# Altium PCB PCB2.PcbDoc
Units mil, origin at the board's own origin, x right, y up, seen from the top; angles counter-clockwise.
Board outline 2952.76 x 2952.76 mil, 2 copper layers (Top Layer, Bottom Layer); 41 components, 22 nets, 105 pads, 4 vias.
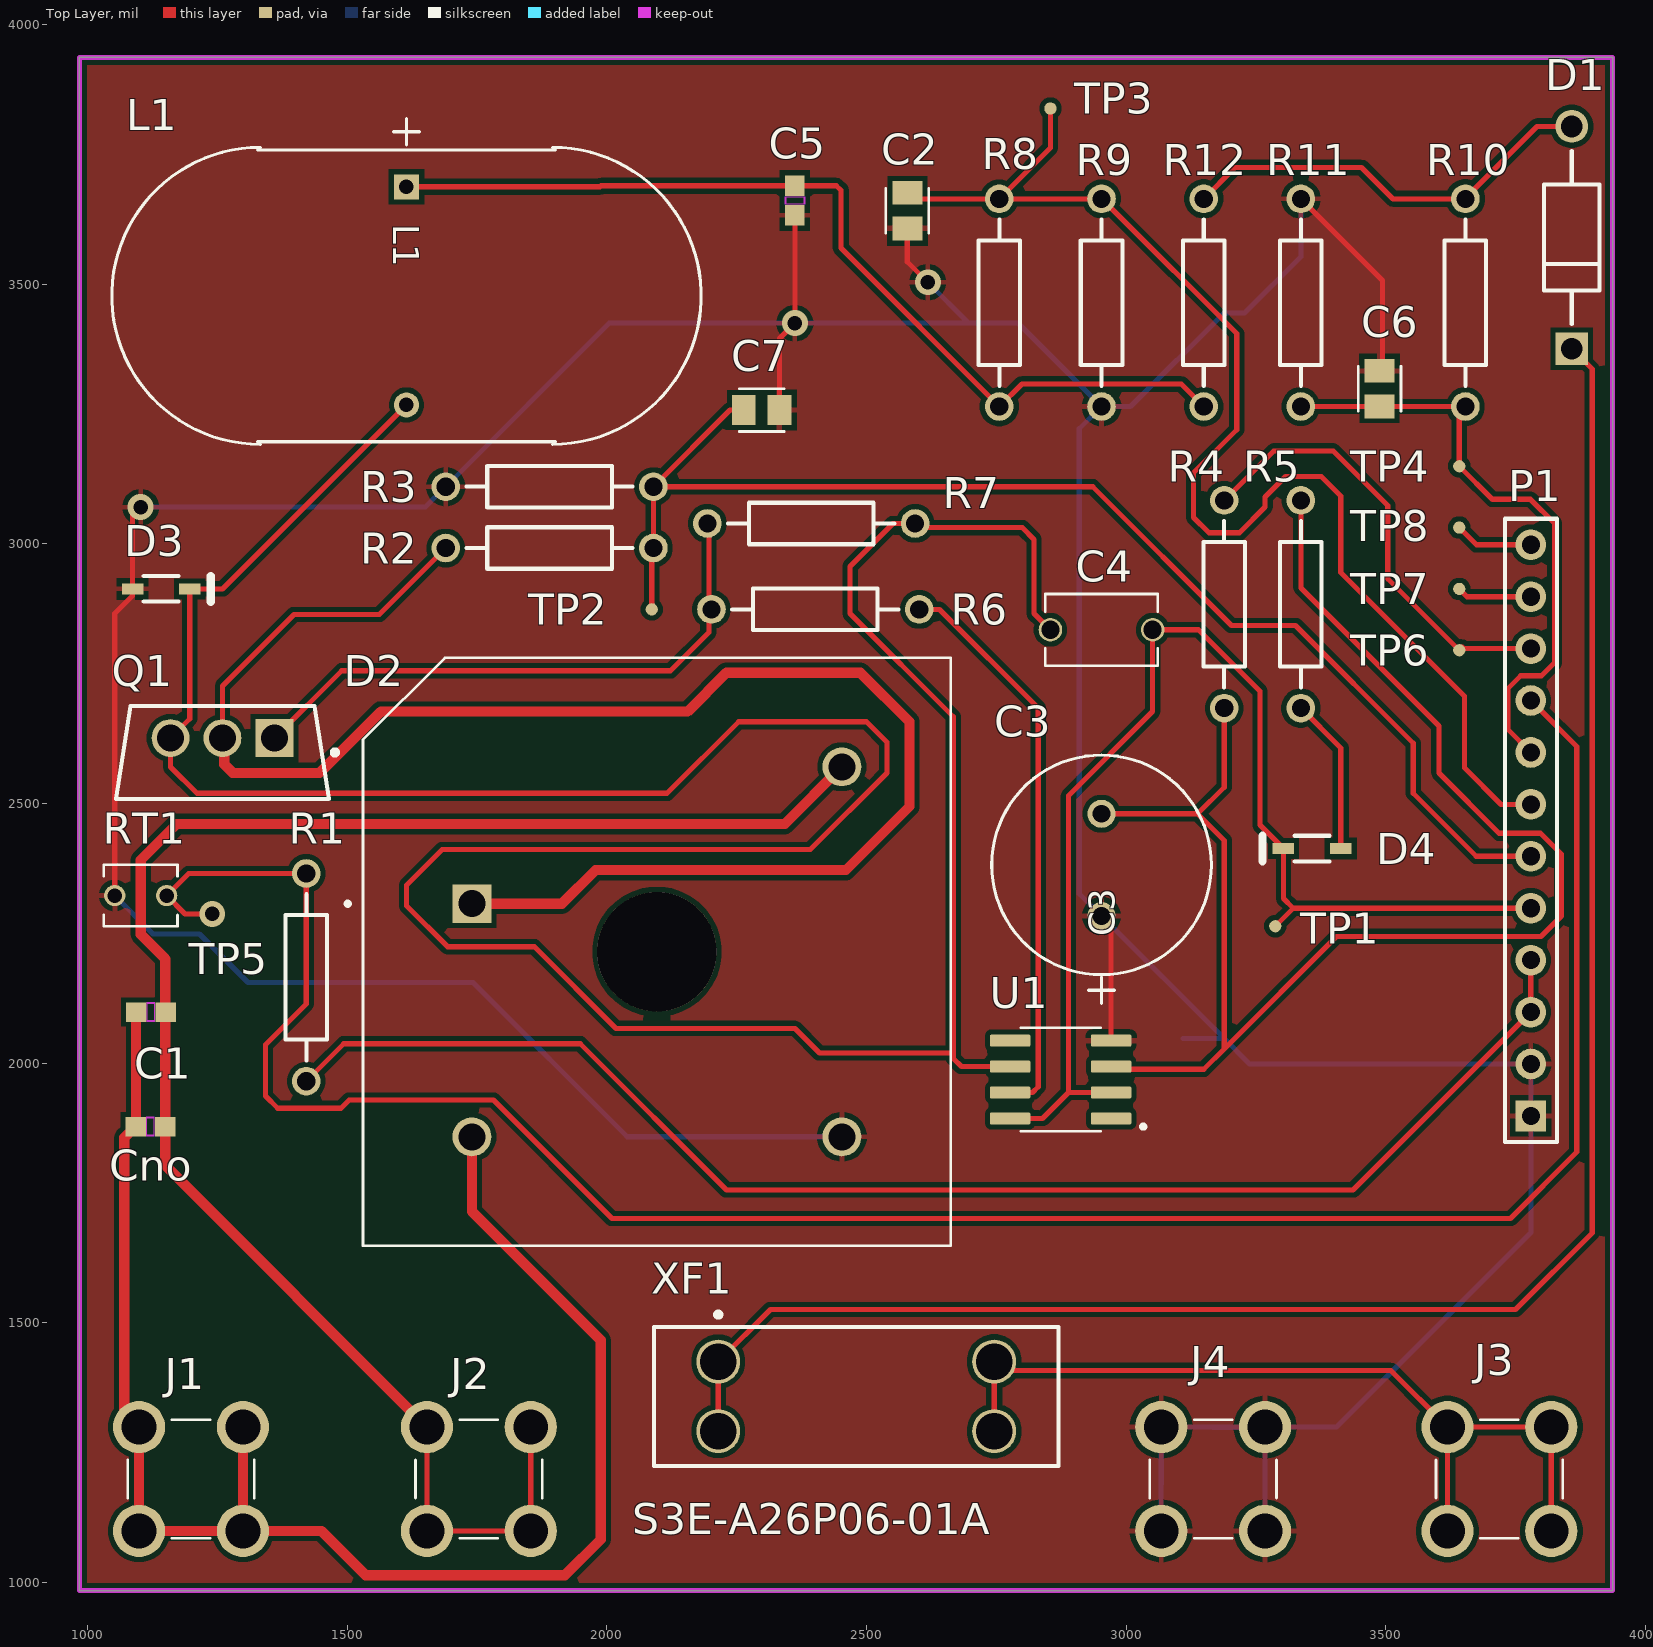
[diagram p0: Top Layer view]
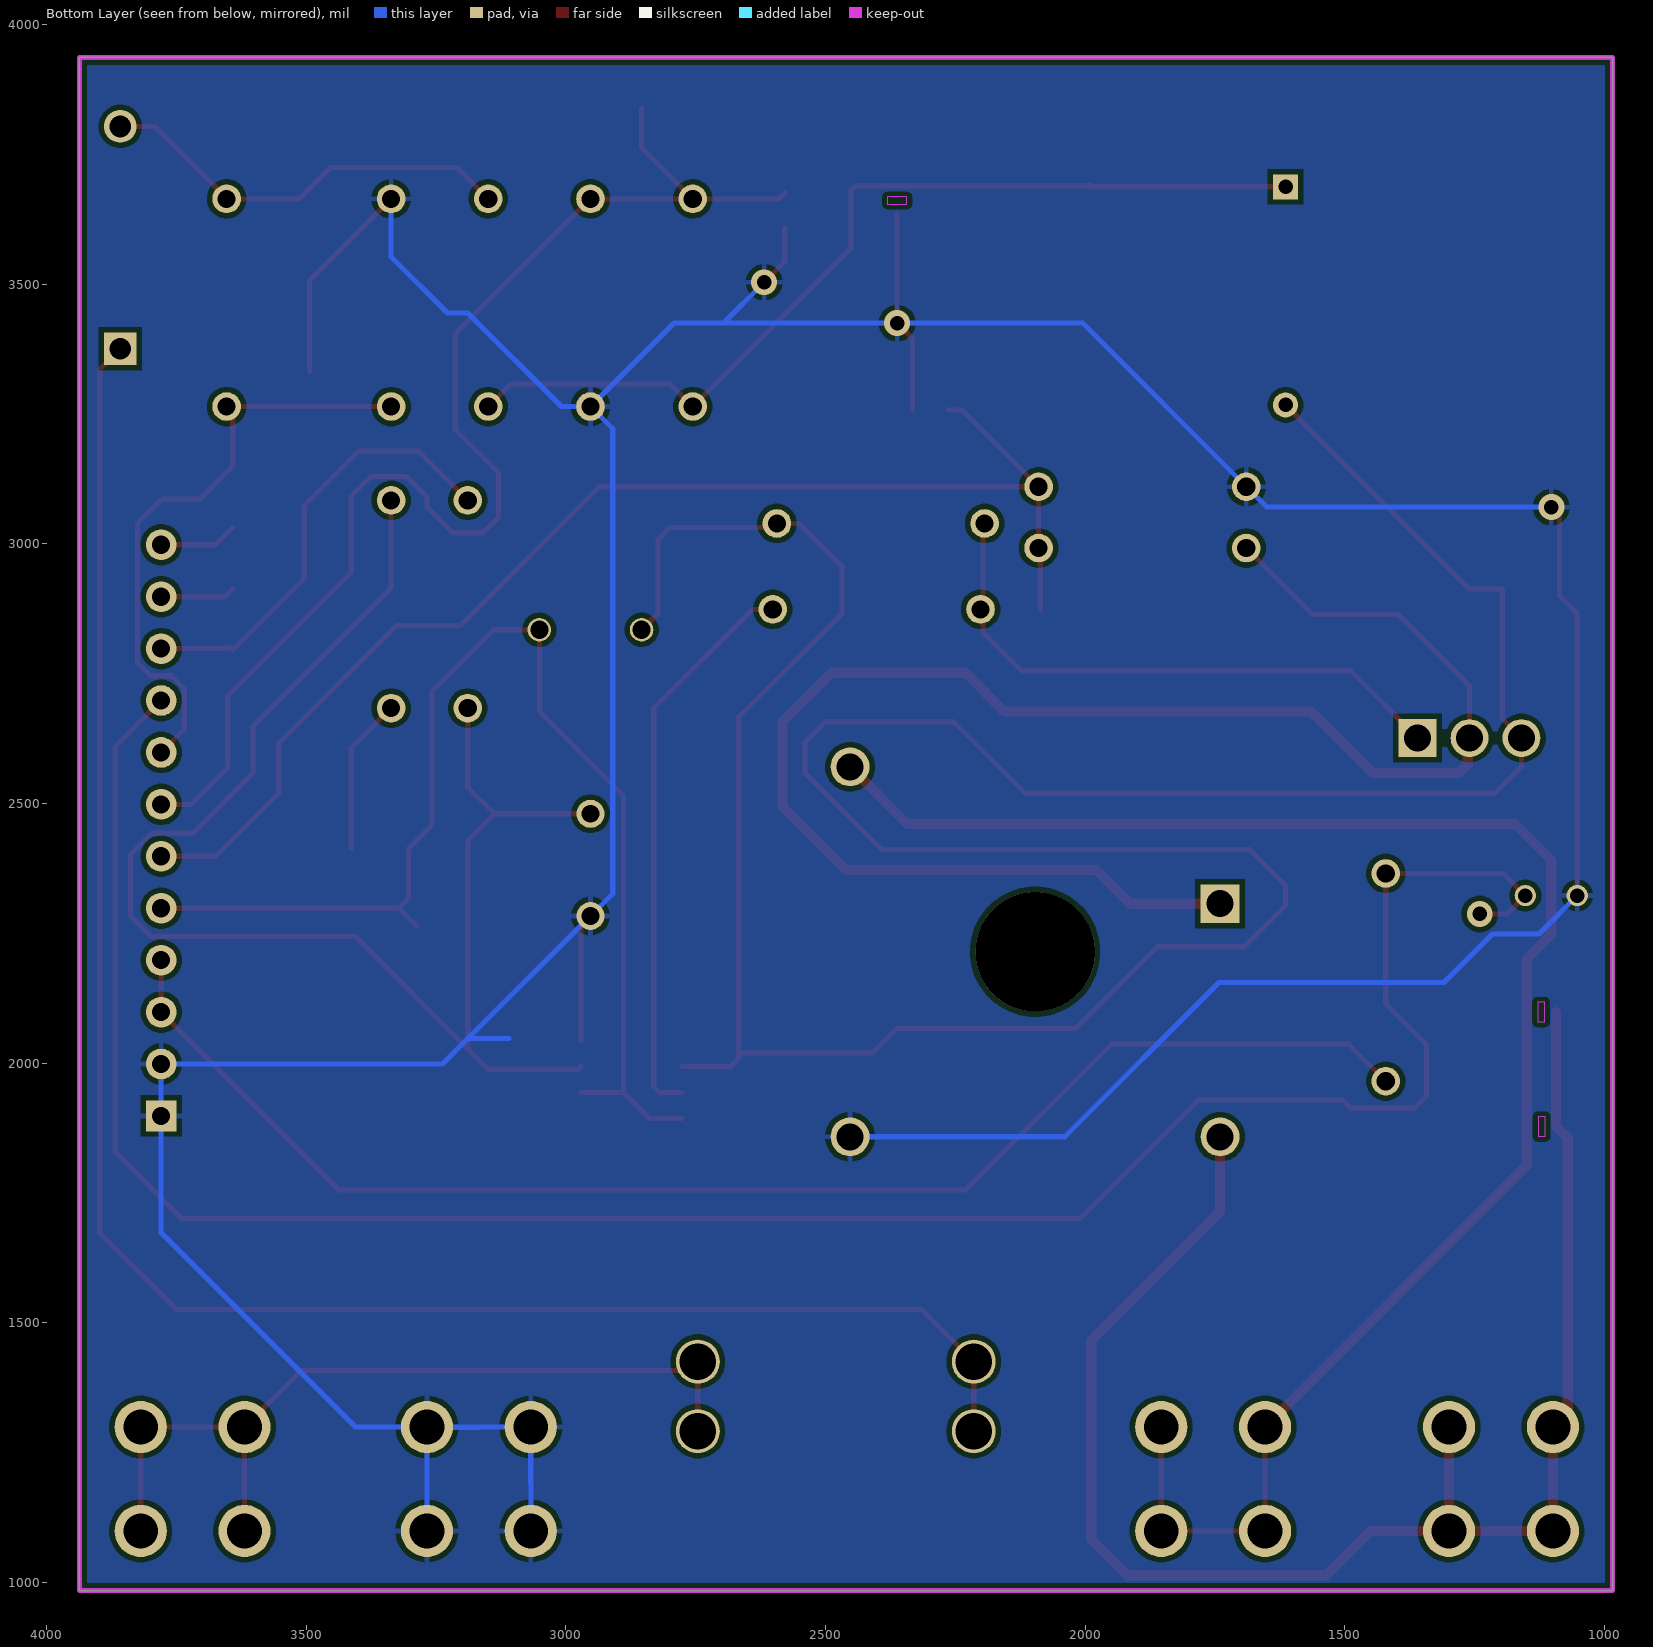
[diagram p1: Bottom Layer view, seen from below]

## Layer stack, top to bottom
Top Solder: solder mask 0.4, Solder Resist, Dk 3.5
Top Layer: signal copper 1.4
Dielectric 1: dielectric 12.6, FR-4, Dk 4.8
Bottom Layer: signal copper 1.4
Bottom Solder: solder mask 0.4, Solder Resist, Dk 3.5

## Board outline
984.25,984.25 984.25,3937.01 3937.01,3937.01 3937.01,984.25

## Design rules (kind name [scope] priority, off if disabled: settings)
Clearance [All] p1: gap=10 ignorepadtopadclearanceinfootprint=FALSE
PolygonConnect [All] p1: connectstyle=Relief reliefconductorwidth=10 reliefentries=4 polygonreliefangle="90 Angle" airgapwidth=10
RoutingVias [All] p1: holewidth=28 width=50 viastyle="Through Hole" minholewidth=28 minwidth=50 maxholewidth=28 maxwidth=50
SolderMaskExpansion [All] p1: expansion=0 istentingtop=FALSE
SupplyNets "Schematic Supply Nets_1" [InNet('+5')] p1: voltage=0.000
SupplyNets "Schematic Supply Nets" [InNet('GND')] p2: voltage=0.000
Width [All] p1: maxlimit=20 minlimit=10 preferedwidth=10 bottomlayer_maxwidth=10 minimp=50.000000 maximp=50.000000 favimp=50.000000
30 further rules are at their usual default settings.

## Components (designator, comment, footprint, x,y, rotation, side; value= is the part's Value field where it differs from the comment)
C1 "28nF" CAPC17595_95N_KEM 1122.05,2098.43 r180 top
C2 "C0805C103K5RACTU" CAPC2012X88N 2578.74,3641.73 r270 top
C3 "3.9uF" CAP_L_10X12P5_RUB 2952.76,2283.46 r90 top
C4 "375nF" CAPRB500W50L550T350H600 2952.76,2834.65 r0 top
C5 "28nF" CAPC17595_95N_KEM 2362.2,3661.42 r90 top
C6 "C0805C103K5RACTU" CAPC2012X88N 3488.19,3299.21 r90 top
C7 "C0805C103K5RACTU" CAPC2012X88N 2298.23,3257.87 r0 top
Cno "28nF" CAPC17595_95N_KEM 1121.06,1877.95 r180 top (schematic designator CnoInstall)
D1 "1N5819-E3/54" FP-1N5819-E3-54-MFG 3858.27,3590.08 r90 top
D2 "GBPC3510" DIOB_GBPC3510 2096.46,2214.57 r0 top
D3 "1N4148WS" FAIR-SOD-323_V 1141.73,2913.39 r0 top
D4 "1N4148WS" FAIR-SOD-323_V 3358.27,2413.39 r180 top
J1 "CT3151-2" CALTEST_CT3151-2 1199.21,1199.21 r90 top
J2 "CT3151-2" CALTEST_CT3151-2 1753.54,1199.21 r90 top
J3 "CT3151-2" CALTEST_CT3151-2 3718.9,1199.21 r90 top
J4 "CT3151-2" CALTEST_CT3151-2 3167.72,1199.21 r90 top
L1 "5708-RC" IND_BOURNS_5708 1614.18,3687.72 r270 top
P1 "Header 12" HDR1X12 3779.53,1898.43 r90 top
Q1 "IXFH26N50P" FP-PG-TO220-3-MFG 1259.84,2598.43 r270 top
R1 "Res2" AXIAL-0.4 1421.26,2165.35 r270 top value=20K
R2 "Res2" AXIAL-0.4 1889.76,2992.13 r180 top value="9 900K"
R3 "Res2" AXIAL-0.4 1889.76,3110.24 r0 top value=100K
R4 "Res2" AXIAL-0.4 3188.98,2883.86 r270 top value=10
R5 "Res2" AXIAL-0.4 3336.61,2883.86 r90 top value=20
R6 "Res2" AXIAL-0.4 2401.57,2874.02 r0 top value=5
R7 "Res2" AXIAL-0.4 2393.7,3039.37 r0 top value=10K
R8 "Res2" AXIAL-0.4 2755.91,3464.57 r90 top value=9000K
R9 "Res2" AXIAL-0.4 2952.76,3464.57 r90 top value=1000K
R10 "Res2" AXIAL-0.4 3653.54,3464.57 r270 top value="10 000K"
R11 "Res2" AXIAL-0.4 3336.61,3464.57 r90 top value=100K
R12 "Res2" AXIAL-0.4 3149.61,3464.57 r270 top value=10
RT1 "NTCLE203E3103FB0" VARRB254W40L360T300H900 1102.36,2322.83 r180 top
TP1 "TPAD6R" TP06R 3287.4,2263.78 r90 top
TP2 "TPAD6R" TP06R 2086.61,2874.01 r0 top
TP3 "TPAD6R" TP06R 2854.33,3838.58 r90 top
TP4 "TPAD6R" TP06R 3641.73,3149.61 r90 top
TP6 "TPAD6R" TP06R 3641.73,2795.27 r0 top
TP7 "TPAD6R" TP06R 3641.73,2913.39 r0 top
TP8 "TPAD6R" TP06R 3641.73,3031.5 r0 top
U1 "UCC27712DR" SOIC127P599X175-8N 2874.02,1968.5 r180 top
XF1 "3557-2" KSTN-3557-2 2480.32,1358.27 r0 top

## Footprints (in the part's own frame and the unit in brackets; to place one, negate y for a bottom-side part, rotate by r counter-clockwise, add the part's x,y. Pads: shape width x height; smd on the part's side, far side on the other; paste and mask are expansions set on the pad)
AXIAL-0.4 [mm] "Axial Device, Thru-Hole; 2 Leads; 0.4 in Pin Spacing"
  round 1.4 hole 0.889: 1(-5.08,0) 2(5.08,0)
  silkscreen extent -4.06,-1.02 4.06,1.02
CALTEST_CT3151-2 [mm]
  round 2.55 hole 1.7: 1(-2.54,2.54) 2(2.54,2.54) 3(-2.54,-2.54) 4(2.54,-2.54)
  silkscreen extent -2.9,-3.1 2.9,3.1, body extent -13.85,-6.75 13.85,6.75, height 6.75
CAP_L_10X12P5_RUB [mil]
  round 54 hole 34 paste-99999 mask+0: 1(0,0) 2(196.85,0)
  silkscreen extent -168,-212 310,212
CAPC2012X88N [mm]
  rect 1.16x1.47 smd: 1(-0.875,0) 2(0.875,0)
  silkscreen extent -1.1,-1.05 1.1,1.05, body extent -1,-0.63 1,0.63, height 0.88
CAPC17595_95N_KEM [mm]
  rect 1x0.95 smd paste+0 mask+0: 1(-0.725,0) 2(0.725,0)
  Top Layer keep-out region: -0.174,-0.424 -0.174,0.424 0.174,0.424 0.174,-0.424
  Keep-Out Layer region: -0.174,-0.475 -0.174,0.475 0.174,0.475 0.174,-0.475
CAPRB500W50L550T350H600 [mm]
  round 1.15 hole 0.889: 1(-2.5,0) 2(2.5,0)
  silkscreen extent -2.75,-1.75 2.75,1.75, body extent -2.75,-1.75 2.75,1.75, height 6
DIOB_GBPC3510 [mm]
  round 1.905 hole 1.321: AC1(9.05,9.05) AC2(-9.05,-9.05) NEG(9.05,-9.05)
  rect 1.905x1.905 / inner round 1.905 / far side rect 1.905x1.905 hole 1.321: POS(-9.05,2.35)
  round 5.84 hole 5.84 unplated: ""(0,0)
  silkscreen extent -15.22,-14.38 14.38,14.38
FAIR-SOD-323_V [mm] "SODFL, 2-Leads, Body 1.25x1.7mm"
  rect 1.05x0.55 smd: 1(-1.4,0) 2(1.4,0)
  silkscreen extent -0.85,-0.62 2.42,0.63, body extent -1.25,-0.63 1.25,0.63, height 1
FP-1N5819-E3-54-MFG [mm]
  rect 1.6x1.6 hole 1.067 paste-2539.97 mask+0: 1(-5.438,0)
  round 1.6 hole 1.067 paste-2539.97 mask+0: 2(5.438,0)
  silkscreen extent -4.24,-1.35 4.24,1.35, body extent -6.34,-1.45 6.34,1.45, height 0.25
FP-PG-TO220-3-MFG [mm]
  rect 1.85x1.85 hole 1.321 paste-2539.97 mask+0: 1(-0.705,2.54)
  round 1.85 hole 1.321 paste-2539.97 mask+0: 2(-0.705,0) 3(-0.705,-2.54)
  silkscreen extent -2.27,-5.2 2.28,5.63, body extent -2.37,-5.55 2.37,5.55, height 0.25
HDR1X12 [mm] "Connector; Header; 12 Position"
  rect 1.5x1.5 hole 0.889: 1(0,0)
  round 1.5 hole 0.889: 2(2.54,0) 3(5.08,0) 4(7.62,0) 5(10.16,0) 6(12.7,0) 7(15.24,0) 8(17.78,0) 9(20.32,0) 10(22.86,0) 11(25.4,0) 12(27.94,0)
  silkscreen extent -1.27,-1.27 29.21,1.27
IND_BOURNS_5708 [mil]
  rect 48x48 hole 28 paste-99999 mask+0: 1(0,0)
  round 48 hole 28 paste-99999 mask+0: 2(420,0)
  silkscreen extent -131,-567 496,567
KSTN-3557-2 [mm] "Fuse Holder, PCB Mount, Thru-Hole, Body 19.8x6.8mm, Height 7.4mm"
  round 2.15 hole 1.8: 1(-6.75,1.7) 2(-6.75,-1.7) 3(6.75,1.7) 4(6.75,-1.7)
  silkscreen extent -9.9,-3.4 9.9,4.12, body extent -9.91,-3.37 9.91,3.37, height 7.74
SOIC127P599X175-8N [mm]
  rrect25% 1.97x0.6 smd: 1(-2.47,1.905) 2(-2.47,0.635) 3(-2.47,-0.635) 4(-2.47,-1.905) 5(2.47,-1.905) 6(2.47,-0.635) 7(2.47,0.635) 8(2.47,1.905)
  silkscreen extent -4.14,-2.53 1.95,2.53, body extent -3,-2.45 3,2.45, height 1.75
TP06R [mm] "Testpoint, round, d=0.6mm"
  round 0.6 smd paste-1: 1(0,0)
VARRB254W40L360T300H900 [mm]
  round 1.04 hole 0.711 mask+0.102: 1(-1.27,0) 2(1.27,0)
  silkscreen extent -1.8,-1.5 1.8,1.5, body extent -1.8,-1.5 1.8,1.49, height 9

## Part data
C1 C5 Cno: library part C0603C473K5RACTU, "SMD Comm X7R, Ceramic, 0.047 uF, 10%, 50 VDC, X7R, SMD, MLCC, Temperature Stable, Class II, 0603", Manufacturer_Name=Kemet, Copyright="Copyright (C) 2026 Ultra Librarian. All rights reserved.", Manufacturer_Part_Number=C0603C473K5RACTU
C2 C6 C7: "Capacitor;Ceramic;Cap;.010uF;Tol+10%;SMT;Vol-Rtg 50V;X7R;TR", Package="805-2 KEMET", Check_prices=https://www.snapeda.com/parts/C0805C103K5RACTU/KEMET/view-part/?ref=eda, MF=KEMET, MP=C0805C103K5RACTU, SnapEDA_Link=https://www.snapeda.com/parts/C0805C103K5RACTU/KEMET/view-part/?ref=snap
C3: library part 400LEX3.9MEFC10X12.5, "No Description Available", Manufacturer_Name=Rubycon, Copyright="Copyright (C) 2026 Ultra Librarian. All rights reserved.", Manufacturer_Part_Number=400LEX3.9MEFC10X12.5
C4: library part FG26X7R1E106KRT00, "Cap Ceramic 10uF 25V X7R 10% Radial 5mm 125C", Package="Radial TDK", Check_prices=https://www.snapeda.com/parts/FG26X7R1E106KRT00/TDK/view-part/?ref=eda, MF=TDK, MP=FG26X7R1E106KRT00, SnapEDA_Link=https://www.snapeda.com/parts/FG26X7R1E106KRT00/TDK/view-part/?ref=snap
D1: library part CMP-02539-000037-2, "DIODE SCHOTTKY 40V 1A DO204AL", Average Rectified Current=1A, Capacitance=110pF, Forward Voltage=900mV, Max Forward Surge Current (Ifsm)=25A, Max Operating Temperature=125°C, Max Repetitive Reverse Voltage (Vrrm)=40V, Min Operating Temperature=-65°C, Package Quantity=1, Peak Reverse Current=1mA, Current=1A, Current Rating=1A, Diameter=2.7mm, Element Configuration=Single, Forward Current=1A, Height=2.7mm, Lead Free="Lead Free", Length=5.2mm, Max Reverse Voltage (DC)=40V, Mount="Through Hole", Number of Pins=2, Output Current=1A, Packaging="Tape and Reel", Peak Non-Repetitive Surge Current=25A, Polarity=Standard, Radiation Hardening=No, Voltage=40V, Voltage Rating (DC)=40V, Width=2.7mm
D2: "Bridge Rectifier Single Phase Standard 1kV QC Terminal GBPC", Package="4-4 Fairchild Semiconductor", Availability="In Stock", Check_prices=https://www.snapeda.com/parts/GBPC3510/Fairchild+Semiconductor/view-part/?ref=eda, MF="Fairchild Semiconductor", MP=GBPC3510, Price=None, Purchase-URL=https://pricing.snapeda.com/search/part/GBPC3510/?ref=eda, SnapEDA_Link=https://www.snapeda.com/parts/GBPC3510/Fairchild+Semiconductor/view-part/?ref=snap
D3 D4: library part CMP-004-00001-2, "Small Signal Diode, 75 V, 0.15 A, -55 to 150 degC, 2-Pin SOD-323, RoHS, Tape and Reel", Capacitance=-323f, Case/Package=SOD-323, Forward Current=150mA, Forward Voltage=1V, Manufacturer=Fairchild, Max Operating Temperature=150°C, Min Operating Temperature=-55°C, Package Description="2-Pin Small Outline Diode Flat Lead, Body 1.7 x 1.25 mm", Package Quantity=3000, Peak Reverse Current=5uA, Datasheet URL=https://www.fairchildsemi.com/datasheets/1N/1N4148WS.pdf, Datasheet Version="Rev. 1.2, 03/2015", Manufacturer URL=https://www.fairchildsemi.com/, Mounting Technology=SM, Package Reference=SOD-323, Packaging=TapeandReel, Pins=2, Recovery Time=4ns, RoHS Compliant=True
J1 J2 J3 J4: "Banana Jack Connector Standard Banana Solder Red", Package=None, Check_prices=https://www.snapeda.com/parts/CT3151-2/Cal+Test+Electronics/view-part/?ref=eda, MF="Cal Test", MP=CT3151-2, SnapEDA_Link=https://www.snapeda.com/parts/CT3151-2/Cal+Test+Electronics/view-part/?ref=snap
L1: "0.4mH", Manufacturer_Name="Bourns Electronics", Copyright="Copyright (C) 2026 Ultra Librarian. All rights reserved.", Manufacturer_Part_Number=5708-RC
P1: "Header, 12-Pin", LatestRevisionDate=17-Jul-2002, LatestRevisionNote="Re-released for DXP Platform.", Publisher="Altium Limited"
Q1: library part CMP-32901-000547-1, "MOSFET N-CH 55V 29A TO220AB", Case/Package=TO-220, Continuous Drain Current (ID)=29A, Drain to Source Breakdown Voltage=55V, Drain to Source Resistance=40mR, Gate to Source Voltage (Vgs)=20V, Input Capacitance=700pF, Max Operating Temperature=175°C, Max Power Dissipation=68W, Min Operating Temperature=-55°C, Threshold Voltage=4V, Contact Plating=Tin, Drain to Source Voltage (Vdss)=55V, Element Configuration=Single, Halogen Free="Not Halogen Free", Height=0.6inch, Lead Free="Lead Free", Length=0.414inch, Max Dual Supply Voltage=55V, Mount="Through Hole", Number of Pins=3, Packaging=Rail/Tube, Power Dissipation=68W, Rds On Max=40mR, REACH SVHC="No SVHC", Rise Time=49ns, RoHS Compliant=Yes, Turn-Off Delay Time=31ns, Turn-On Delay Time=7ns, Width=0.185inch
R1 R2 R3 R4 R5 R6 R7 R8 R9 R10 R11 R12: "Resistor", LatestRevisionDate=17-Jul-2002, LatestRevisionNote="Re-released for DXP Platform.", PackageDescription="Axial Device, Thru-Hole; 2 Leads; 0.4 in Pin Spacing", PackageReference=AXIAL-0.4, Published=8-Jun-2000, Publisher="Altium Limited"
RT1: "NTC Thermistors,NTC Ni 0.4 lead 10K 1% bulk e3", Package=None, Check_prices=https://www.snapeda.com/parts/NTCLE203E3103FB0/Vishay/view-part/?ref=eda, MF=Vishay, MP=NTCLE203E3103FB0, SnapEDA_Link=https://www.snapeda.com/parts/NTCLE203E3103FB0/Vishay/view-part/?ref=snap
TP1 TP2 TP3 TP4 TP6 TP7 TP8: library part CMP-00028-00002-2, "0.6mm round", Pins=1
U1: "1.8-A/2.8-A, 620V half bridge driver with interlock", Package="SOIC-8 Texas Instruments", Check_prices=https://www.snapeda.com/parts/UCC27712DR/Texas+Instruments/view-part/?ref=eda, MF="Texas Instruments", MP=UCC27712DR, SnapEDA_Link=https://www.snapeda.com/parts/UCC27712DR/Texas+Instruments/view-part/?ref=snap
XF1: library part CMP-2000-05461-1, "FUSE HOLDER, PCB MOUNT, 500VAC, 20A, ROHS", Current Rating=30A, Manufacturer=Keystone-Electronics, Voltage=500V, Category=CircuitProtection, Contact Finish=TinNickel, Contact Material=Brass, Datasheet URL=http://datasheet.octopart.com/3557-2-Keystone-datasheet-15715937.pdf, Datasheet Version=Apr-13, Family=Fuseholders, For Use With/Related Products=ATC,ATO257,MINI897, Fuse Size="0.43\"Lx0.15\"Wx0.64\"H(10.92mmx3.81mmx16.25mm)", Fuse Type=Blade, Fuseholder Type=Block, Manufacturer URL=http://www.keyelco.com/, Mounting Type=PCB, Number of Circuits=1, Orientation=Vertical, Series=-, Termination Style=PCPin

## Via types
v1: diameter 50, hole 28, Top Layer to Bottom Layer, 4 vias

## Nets (pads, with @x,y where several pads share a name; then routed paths per layer and width w, separated by ;. In a path a pad name is that pad's centre, name@x,y a point inside that pad or via, vN(x,y) a via of type N, cw(c..) or ccw(c..) an arc to the next point about the centre after c; other vN are vias at no path point)
+5: P1.3 P1.4 R1.2 | length 2752.2
  Top Layer w10: R1.2@1426.84,1965.35 R1.2 1493.31,2037.4 1948.82,2037.4 2230.31,1755.91 3437.01,1755.91 P1.3 P1.4
GND: C2.2 C3.1 C5.1 C6.2 C7.2 D2.NEG D3.1 J4.1 J4.2 J4.3 J4.4 P1.1 P1.2 R3.1 R9.1 R11.2 RT1.2 U1.4 | length 9937.7
  Top Layer w10: RT1.2 1052.36,2866 1086.61,2900.25 D3.1 1086.61,3055.12 v1(1102.36,3070.87) ; C7.2 2332.68,3395.67 v1(2362.2,3425.2) C5.1 ; C2.2 2578.74,3543.31 v1(2618.11,3503.94) ; C3.1 2971.26,2264.96 U1.4 ; R11.2 3494.09,3507.09 C6.2@3494.09,3331.69
  Bottom Layer w10: RT1.2 1126.2,2249 1215.57,2249 1309.06,2155.51 1742.13,2155.51 2039.37,1858.27 D2.NEG ; v1(1102.36,3070.87) 1650.39,3070.87 R3.1 2004.72,3425.2 v1(2362.2,3425.2) 2696.85,3425.2 ; v1(2618.11,3503.94) 2696.85,3425.2 ; J4.1 3067,1099.21 3067,1189.28 3067.72,1190 J4.2 3167.79,1299.21 3168,1299 3267.5,1299 J4.4 ; 3110.24,2047.24 3188.97,2047.24 ; J4.3 J4.4 ; R11.2 3336.61,3553.15 3228.35,3444.88 3188.98,3444.88 3008.66,3264.57 R9.1 ; 2696.85,3425.2 2792.13,3425.2 R9.1 ; R9.1 2910,3221.81 2910,2326.22 C3.1 3188.97,2047.24 ; 3188.97,2047.24 3237.79,1998.43 P1.2 3780.11,1997.84 3780.11,1673.81 3405.51,1299.21 J4.4
NetC1_1: C1.1 Cno.1 D2.AC1 J2.1 J2.2 J2.3 J2.4 | length 3345.2
  Top Layer w10: J2.2 J2.1 J2.3 J2.4
  Top Layer w19.68: J2.2 1149.61,1803.15 Cno.1 1149.61,2200.79 1102.36,2248.03 1102.36,2391.36 1171.63,2460.63 2342.52,2460.63 D2.AC1
NetC1_2: C1.2 Cno.2 D2.AC2 J1.1 J1.2 J1.3 J1.4 | length 3051.6
  Top Layer w19.68: C1.2 1093.5,1878.94 Cno.2 1070.87,1856.3 1070.87,1327.56 J1.2 J1.1 J1.3 ; J1.4 J1.3 ; D2.AC2 1740.16,1714.57 1988.19,1466.54 1988.19,1082.68 1919.29,1013.78 1535.43,1013.78 1450,1099.21 J1.3
NetC2_1: C2.1 P1.7 R8.2 R9.2 TP3.1 | length 2496.6
  Top Layer w10: C2.1 2590.35,3664.57 R8.2 ; TP3.1 2854.33,3762.99 R8.2 ; P1.7 3722.05,2498.43 3651.57,2568.9 3651.57,2706.69 3413.39,2944.88 3413.39,3092.52 3375.98,3129.92 3307.09,3129.92 3267.72,3090.55 3267.72,3070.87 3218.5,3021.65 3159.45,3021.65 3129.92,3051.18 3129.92,3136.92 3213,3220 3213,3405 2973,3645 2972.32,3645 R9.2 R8.2
NetC3_2: C3.2 R4.2 R5.2 U1.3 | length 2930.5
  Top Layer w10: C3.2 3137.79,2480.31 ; U1.3 2976.58,1988.19 3149.61,1988.19 3188.98,2027.56 ; R4.2 3188.98,2531.5 3137.79,2480.31 ; R5.2 3336.61,2915.36 3602.36,2649.61 3602.36,2559.06 3718.46,2442.95 3797.97,2442.95 3838.58,2402.34 3838.58,2283.47 3799.21,2244.09 3405.51,2244.09 3188.98,2027.56 ; 3137.79,2480.31 3188.98,2429.13 3188.98,2027.56
NetC4_1: C4.1 D3.2 L1.2 Q1.3 R7.2 U1.6 | length 6411
  Top Layer w10: L1.2 1259.85,2913.39 D3.2 1196.85,2663.19 Q1.3 1159.84,2570.47 1210.63,2519.68 2116.14,2519.68 2253.94,2657.48 2500,2657.48 2539.37,2618.11 2539.37,2559.06 2391.73,2411.42 1683.07,2411.42 1614.17,2342.52 1614.17,2303.15 1692.91,2224.41 1860.24,2224.41 2017.72,2066.93 2362.2,2066.93 2409.45,2019.68 2667.32,2019.68 ; R7.2@2593.7,3031.5 2800,3031.5 2822.76,3008.74 2822.76,2866.22 C4.1 ; R7.2 2551.18,3039.37 2468.5,2956.69 2468.5,2866.14 2667.32,2667.32 2667.32,2019.68 ; U1.6 2683.07,1993.5 2667.32,2009.25 2667.32,2019.68
NetC4_2: C4.2 D4.2 P1.5 TP1.1 U1.2 U1.8 | length 2380.1
  Top Layer w10: U1.8 2838.94,1893.5 2888.94,1943.5 ; U1.2 2888.94,1943.5 ; TP1.1 3322.05,2298.43 ; P1.5 3322.05,2298.43 ; 2888.94,1943.5 2888.94,2514.92 3051.18,2677.17 C4.2 3139.36,2834.64 3257.87,2716.13 3257.87,2458.66 D4.2 3303.15,2317.33 3322.05,2298.43
NetC5_2: C5.2 L1.1 R8.1 R12.2 | length 1813.8
  Top Layer w10: L1.1 1987,3687.72 1989.24,3689.96 C5.2 2441.93,3689.96 2450.79,3681.1 2450.79,3569.69 R8.1 2799.34,3308 3106.17,3308 R12.2
NetC6_1: C6.1 P1.8 R10.2 R11.1 TP4.1 | length 1187.8
  Top Layer w10: R11.1 3649.61,3264.57 R10.2@3653.54,3260.63 ; R10.2 3641.73,3252.75 TP4.1 3705.47,3085.87 3779.13,3085.87 3825,3040 3825,2771 3800,2746 3760,2746 3735,2721 3735,2642.95 P1.8
NetC7_1: C7.1 P1.6 R2.1 R3.2 TP2.1 | length 2513.8
  Top Layer w10: TP2.1 2086.61,2988.98 R2.1 R3.2 ; C7.1 2237.4,3257.87 R3.2 ; P1.6 3674.41,2398.43 3553.15,2519.69 3553.15,2616.14 3326.29,2843 3203,2843 2935.76,3110.24 R3.2
NetD1_1: D1.1 XF1.1 XF1.2 | length 3638.7
  Top Layer w10: XF1.2 XF1.1 2314.96,1525.59 3750,1525.59 3897.64,1673.23 3897.64,3336.61 D1.1
NetD1_2: D1.2 R10.1 R12.1 | length 816.6
  Top Layer w10: R12.1 3210.04,3725 3453.35,3725 3513.78,3664.57 3651.58,3664.57 3791.18,3804.17 D1.2
NetD2_POS: D2.POS Q1.2 R2.2 | length 3221.2
  Top Layer w10: Q1.2 1259.84,2726.38 1397.64,2864.17 1561.81,2864.17 R2.2
  Top Layer w19.68: Q1.2 1263.07,2622.95 1263.07,2575.52 1279.53,2559.06 1446.85,2559.06 1564.96,2677.17 2155.51,2677.17 2230.32,2751.97 2488.19,2751.97 2582.82,2657.34 2582.82,2510.54 2582.82,2494.23 2460.63,2372.05 1978.35,2372.05 1913.39,2307.09 D2.POS
NetD4_1: D4.1 R5.1 | length 302.3
  Top Layer w10: R5.1 3413.39,2607.08 D4.1
NetJ3_1: J3.1 J3.2 J3.3 J3.4 XF1.3 XF1.4 | length 1658.9
  Top Layer w10: XF1.4 XF1.3 2763,1408.27 3509.84,1408.27 J3.2 ; J3.1 J3.2 ; J3.3 J3.4 J3.2
NetP1_9: P1.9 R1.1 RT1.1 | length 4445.8
  Top Layer w10: v1(1240.16,2287.4) 1187.79,2287.4 RT1.1 1194.88,2365.35 R1.1 1421.26,2114.17 1342.52,2035.43 1342.52,1937.01 1366.14,1913.39 1488.19,1913.39 1503.94,1929.13 1781.5,1929.13 2009.84,1700.79 3740.16,1700.79 3868.11,1828.74 3868.11,2609.84 P1.9
NetP1_10: P1.10 R4.1 TP6.1 | length 866.8
  Top Layer w10: R4.1 3284.25,3179.13 3398.82,3179.13 3503.94,3074.02 3503.94,2933.07 TP6.1 ; TP6.1@3647.64,2801.18 3650.39,2798.43 P1.10
NetP1_11: P1.11 TP7.1 | length 144
  Top Layer w10: TP7.1 3656.69,2898.43 P1.11
NetP1_12: P1.12 TP8.1 | length 151.5
  Top Layer w10: TP8.1 3674.8,2998.43 P1.12
NetQ1_1: Q1.1 R6.1 R7.1 | length 1125.3
  Top Layer w10: Q1.1 1489.57,2755.91 2122.84,2755.91 2196.85,2829.92 R7.1@2196.85,3033.81
NetR6_2: R6.2 U1.7 | length 1076.7
  Top Layer w10: R6.2@2621.26,2874.02 2640.95,2874.02 2831,2683.96 2831,1954.5 2820,1943.5 U1.7
pads on no net: D2. U1.1 U1.5

## Polygon pours and split planes (outlines as drawn)
GND on Bottom Layer "GND_L02_P000" (solid, remove dead copper, pour order 0): 799.21,4114.17 811.02,4102.36 4299.21,4102.36 4299.21,976.38 4102.36,779.53 4066.93,814.96 625.98,814.96
GND on Top Layer "GND_L01_P001" (solid, remove dead copper, pour order 1): 826.77,4137.8 3976.38,4137.8 4122.05,3992.13 4122.05,751.97 653.54,751.97

## Keep-outs
Keep-Out Layer:
  the board outline again, w10

## Silkscreen, mask and mechanical layers (free items; w line width, h text height)
Top Overlay:
  text "TP5" at 1195.04,2171.42 h60
  text "S3E-A26P06-01A" at 2049.37,1092.68 h60
Mechanical 1:
  the board outline again, w20